# Altium PCB ePBR24_ACU_Power_rev0.PcbDoc (part 1 of 4)
Units mil, origin at the board's own origin, x right, y up, seen from the top; angles counter-clockwise.
Board outline 8165 x 3858 mil, 2 copper layers (Top Layer, Bottom Layer); 138 components, 121 nets, 515 pads, 2055 vias.
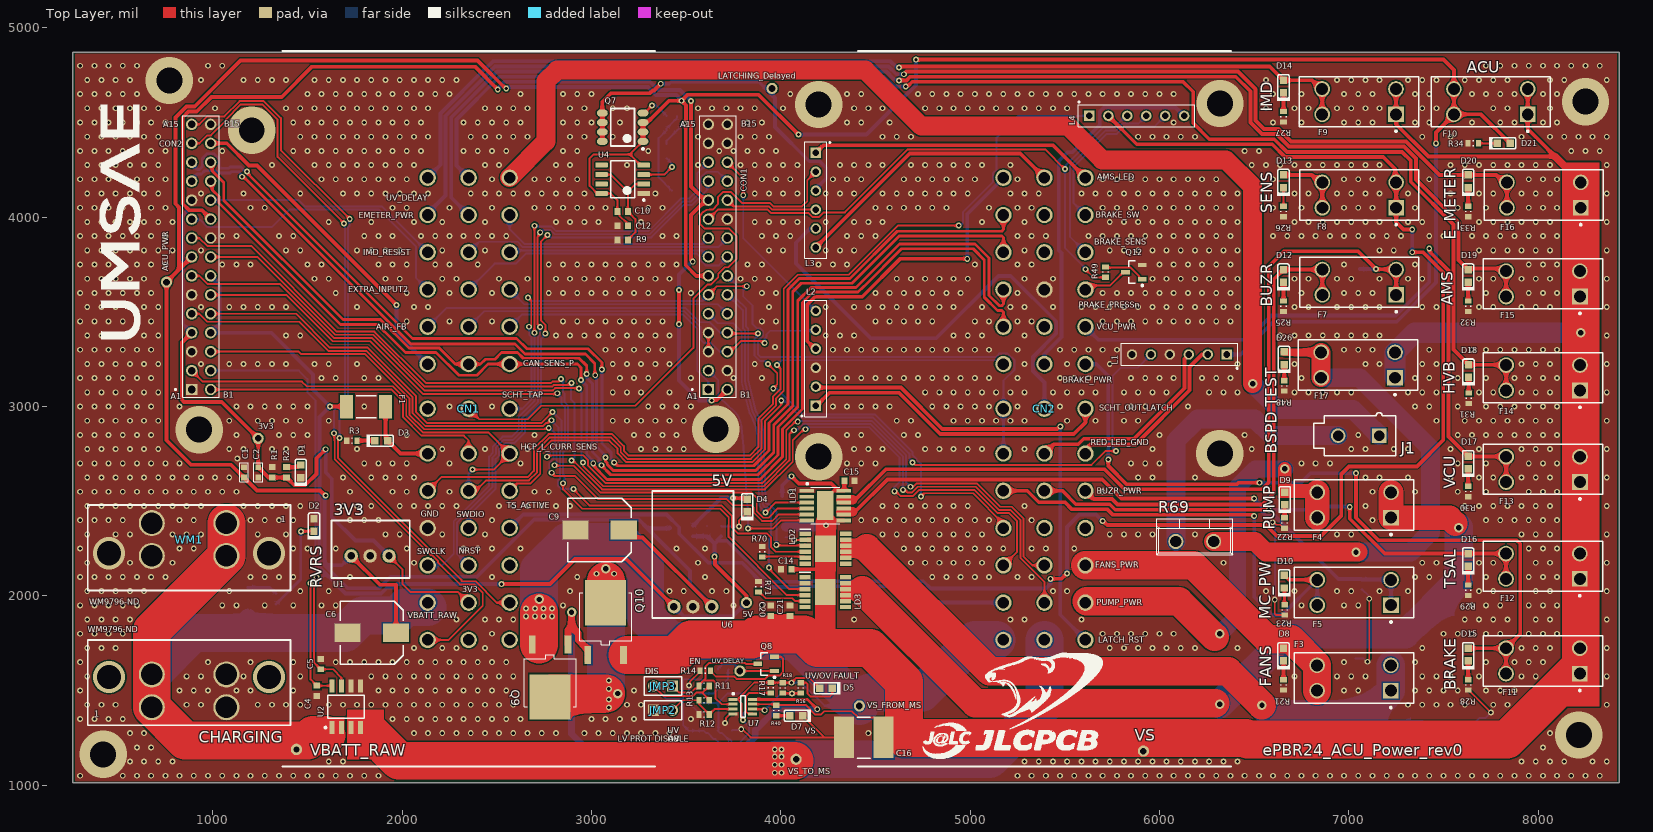
[diagram p0: Top Layer view]
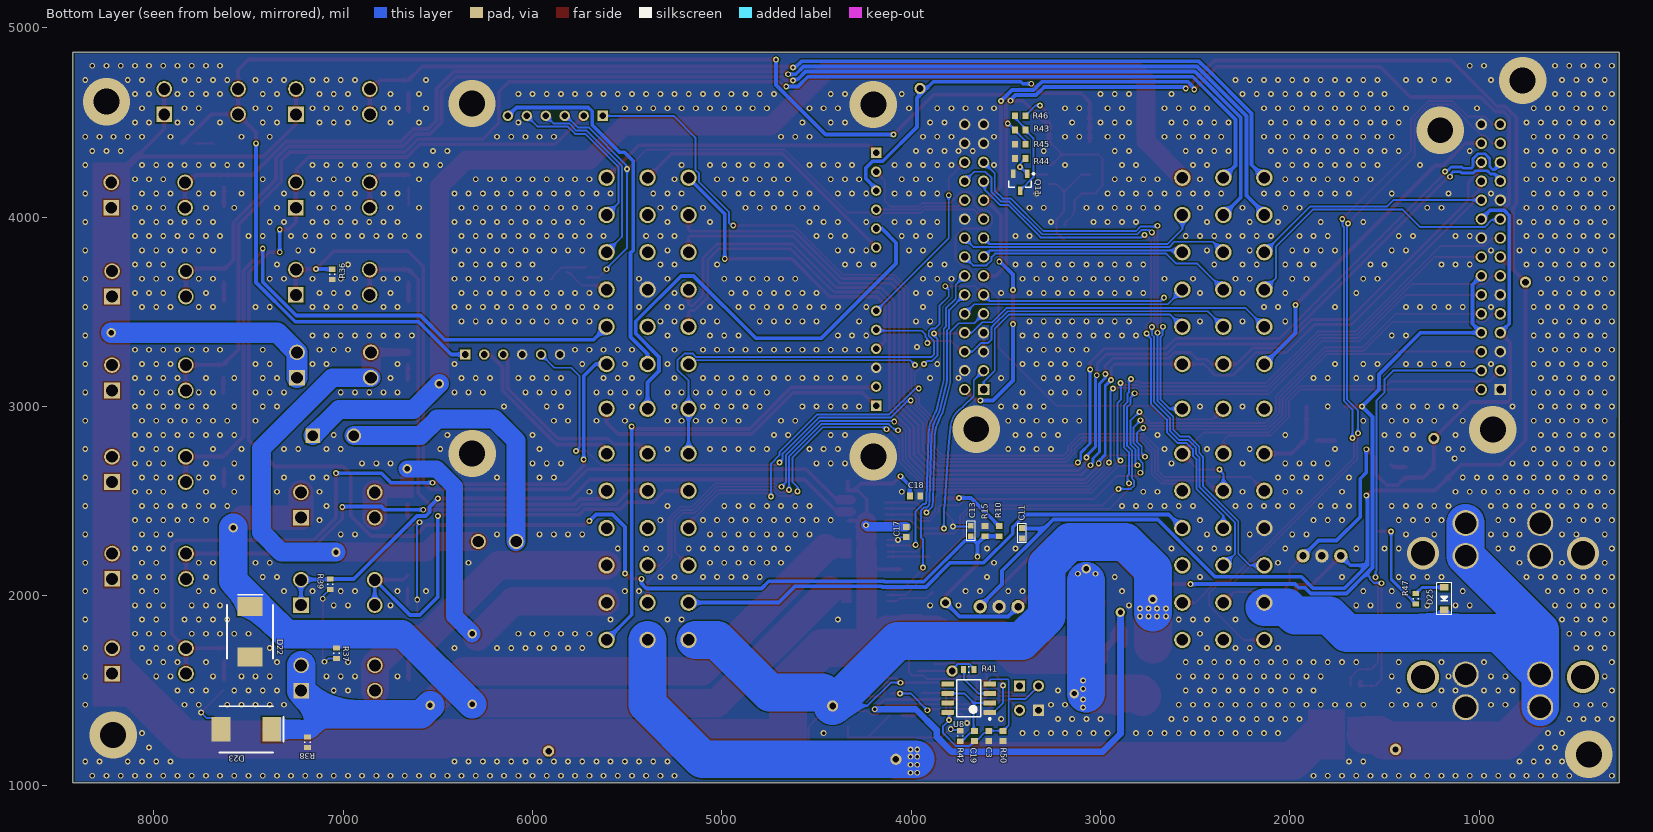
[diagram p1: Bottom Layer view, seen from below]

## Layer stack, top to bottom
Top Solder: solder mask 0.4, Solder Resist, Dk 3.5
Top Layer: signal copper 2.8
Dielectric 1: dielectric 12.6, FR-4, Dk 4.8
Bottom Layer: signal copper 2.8
Bottom Solder: solder mask 0.4, Solder Resist, Dk 3.5

## Board outline
262,1012 8427,1012 8427,4870 262,4870

## Design rules (kind name [scope] priority, off if disabled: settings)
Clearance "Stitching GND" [IsStitchingVia and InNet('GND') vs (IsVia and (Not IsStitchingVia)) Or IsPad] p1: gap=5 ignorepadtopadclearanceinfootprint=FALSE
Clearance [All] p2: gap=7 ignorepadtopadclearanceinfootprint=FALSE except(0: Arc-Hole Track-Hole SMDPad-Hole THPad-Hole Via-Hole Fill-Hole Poly-Hole Region-Hole Text-Hole)
ComponentClearance [All] p1: gap=0 collisioncheckmode=3 verticalgap=0 showdistances=FALSE
DiffPairsRouting [All] p1: maxlimit=10 minlimit=10 mostfreqgap=10 toplayer_minwidth=15 toplayer_maxwidth=15 toplayer_prefwidth=15 bottomlayer_minwidth=15 bottomlayer_maxwidth=15 bottomlayer_prefwidth=15 maxuncoupledlength=500
HoleSize [All] p1: absolutevalues=TRUE maxlimit=200 minlimit=10 maxpercent=80.000 minpercent=20.000
HoleToHoleClearance [All] p1: gap=8 allowstackedmicrovias=TRUE
MinimumAnnularRing MinimumAnnularRing_Pad [IsPad] p1: minimumring=7
MinimumAnnularRing MinimumAnnularRing_Via [IsVia] p2: minimumring=5
MinimumSolderMaskSliver [All] p1: minsoldermaskwidth=4
PlaneClearance [All] p1: clearance=15
PlaneConnect PlaneConnect_12V [InNet('12V')] p1: planeconnectstyle=Direct reliefexpansion=20 reliefentries=4 reliefconductorwidth=20 reliefairgap=10
PlaneConnect PlaneConnect_1 [All] p2: planeconnectstyle=Relief reliefexpansion=15 reliefentries=4 reliefconductorwidth=15 reliefairgap=10
PolygonConnect [All] p1: connectstyle=Direct reliefconductorwidth=15 reliefentries=4 polygonreliefangle="90 Angle" airgapwidth=10
RoutingVias [All] p1: holewidth=17 width=31 viastyle="Through Hole" minholewidth=15 minwidth=29 maxholewidth=50 maxwidth=100
SilkToSilkClearance [All] p1: silktosilkclearance=7
SilkToSolderMaskClearance [IsPad] p1: minsilkscreentomaskgap=2 clearancetoexposedcopper=TRUE
SolderMaskExpansion [All] p1: expansion=3 istentingtop=FALSE
Width [All] p1: maxlimit=200 minlimit=7 preferedwidth=15
21 further rules are at their usual default settings.

## Classes and differential pairs
component class "1  - Connectors": CN1 CN2 CON1 CON2 L1 L2 L3 L4 Q12 R49 WM1 WM9796-ND WM?
component class Designator: ACU_PWR D3 D8 D9 D10 D12 D13 D14 D15 D16 D17 D18 D19 D20 D21 D26 F1 F3 F4 F5 F7 F8 F9 F10 F11 F12 F13 F14 F15 F16 F17 J1 R3 R21 R22 R23 R25 R26 R27 R28 R29 R30 R31 R32 R33 R34 R48 R69
differential pair CAN: +CAN_P -CAN_N
differential pair CAN_SENS: +CAN_SENS_P -CAN_SENS_N

## Components (designator, comment, footprint, x,y, rotation, side; value= is the part's Value field where it differs from the comment)
3V3 "Test Via" "Test Via"#1 1240,2832 r270 top (schematic designator 5V)
5V "Test Via" "Test Via"#1 3818.72,1964.38 r180 top (schematic designator 3V3)
ACU_PWR "Test Via" "Test Via"#1 756,3657 r270 top
C1 "Cap" 0603R-generic 1165,2680 r270 top value=10uF
C2 "Cap" 0603R-generic 1240,2625.06 r90 top value=10uF
C3 "Cap Semi" 1608[0603] 3590.87,1260 r90 bottom value=10uF
C4 "Cap Semi" 1608[0603] 1550,1498.03 r90 top value=0.1uF
C5 "Cap Semi" 1608[0603] 1570,1640 r270 top value=0.1uF
C6 "UUD1H101MNL1GS" NIC-CAPA2-8X10_V 1840,1805 r180 top
C9 "UUD1H101MNL1GS" NIC-CAPA2-8X10_V 3042.95,2348 r180 top
C10 "Cap Semi" 1608[0603] 3165,4030 r180 top value=15uF
C11 "Cap" 0603R-generic 3415,2303.08 r90 bottom value=10uF
C12 "Cap Semi" 1608[0603] 3165,3955 r0 top value=10uF
C13 "Cap" 0603R-generic 3685,2370 r270 bottom value=10uF
C14 "Cap Semi" 1608[0603] 4029,2140.11 r0 top value=10uF
C15 "Cap Semi" 1608[0603] 4363,2608 r180 top value=10uF
C16 "Cap Semi" "2J-Lead 6.1 x 5.3" 4436,1253 r180 top value=33uF
C17 "Cap Semi" 1608[0603] 4026,2337.44 r90 bottom value=10uF
C18 "Cap Semi" 1608[0603] 3980,2528 r0 bottom value=10uF
C19 "Cap Semi" 1608[0603] 3665.87,1260 r270 bottom value=10uF
C20 "Cap Semi" 1608[0603] 3947.5,1922 r270 top value=10uF
C21 "Cap Semi" 1608[0603] 4048.35,1922 r270 top value=10uF
CN1 "5-1418363-1" "LEAVYSEAL 39 PIN VER" 2351.54,2988 r90 top
CN2 "5-1418363-1" "LEAVYSEAL 39 PIN VER" 5392.52,2988 r270 top
CON1 "6-534998-3" *TE_6-146257-5 3719,3690 r90 top
CON2 "6-534998-3" *TE_6-146257-5 989.98,3690 r90 top
D1 "KP-1608MGC" KING-0603LED_GREEN_V 1465,2657.8 r90 top
D2 "RVS PLTY" TOSH-0603LED_RED_V 1535,2375 r90 top
D3 "KP-1608MGC" KING-0603LED_GREEN_V 1890,2820 r0 top
D4 "KP-1608MGC" KING-0603LED_GREEN_V 3823.65,2477 r90 top
D5 "UVOV FAULT" TOSH-0603LED_RED_V 4239,1513 r180 top
D7 "BEAR EYE" TOSH-0603LED_RED_V 4081.68,1367.44 r180 top
D8 "KP-1608MGC" KING-0603LED_GREEN_V 6655,1690 r90 top
D9 "KP-1608MGC" KING-0603LED_GREEN_V 6662,2514.5 r90 top
D10 "KP-1608MGC" KING-0603LED_GREEN_V 6659,2075 r90 top
D12 "KP-1608MGC" KING-0603LED_GREEN_V 6655,3690 r90 top
D13 "KP-1608MGC" KING-0603LED_GREEN_V 6655,4190 r90 top
D14 "KP-1608MGC" KING-0603LED_GREEN_V 6655,4690 r90 top
D15 "KP-1608MGC" KING-0603LED_GREEN_V 7630,1690 r90 top
D16 "KP-1608MGC" KING-0603LED_GREEN_V 7630,2190 r90 top
D17 "KP-1608MGC" KING-0603LED_GREEN_V 7630,2704.47 r90 top
D18 "KP-1608MGC" KING-0603LED_GREEN_V 7632,3188 r90 top
D19 "KP-1608MGC" KING-0603LED_GREEN_V 7630,3690 r90 top
D20 "KP-1608MGC" KING-0603LED_GREEN_V 7630,4190 r90 top
D21 "KP-1608MGC" KING-0603LED_GREEN_V 7818.16,4390 r0 top
D22 "S8MC-13" S8MC-13 7492,1810.86 r90 bottom
D23 "S8MC-13" S8MC-13 7511,1295 r180 bottom
D25 "" SOD-123 1185,1925 r90 bottom
D26 "KP-1608MGC" KING-0603LED_GREEN_V 6658,3254.93 r90 top
F1 "1812L050PR" LFUS-1812L050_V 1810,3000 r0 top
F3 "36-3568-ND" KSTN-3568_V 7027,1566.22 r180 top
F4 "36-3568-ND" KSTN-3568_V 7028,2480 r180 top
F5 "36-3568-ND" KSTN-3568_V 7028,2017.93 r180 top
F7 "36-3568-ND" KSTN-3568_V 7055,3656.53 r180 top
F8 "36-3568-ND" KSTN-3568_V 7055,4116.93 r180 top
F9 "36-3568-ND" KSTN-3568_V 7054.23,4610 r180 top
F10 "36-3568-ND" KSTN-3568_V 7750,4610 r180 top
F11 "36-3568-ND" KSTN-3568_V 8025,1656.54 r180 top
F12 "36-3568-ND" KSTN-3568_V 8025,2156.53 r180 top
F13 "36-3568-ND" KSTN-3568_V 8026,2668 r180 top
F14 "36-3568-ND" KSTN-3568_V 8026,3152 r180 top
F15 "36-3568-ND" KSTN-3568_V 8025.88,3647.93 r180 top
F16 "36-3568-ND" KSTN-3568_V 8030,4116.93 r180 top
F17 "36-3568-ND" KSTN-3568_V 7049,3219 r180 top
J1 "39-28-1023" MOLX-39-28-1023-2_V 7052,2846 r270 top
JMP2 "Header 2" "2Pin Jumper" 3328,1396.03 r0 top
JMP3 "Header 2" "2Pin Jumper" 3428,1524 r180 top
L1 "6 Pin Header" 5-146285-6 6155,3275 r180 top
L2 "6 Pin Header" 5-146285-6 4185,3205 r90 top
L3 "6 Pin Header" 5-146285-6 4185,4140 r270 top
L4 "6 Pin Header" 5-146285-6 5830,4535 r0 top
LATCHING_Delayed "Test Via" "Test Via"#1 3954,4680 r270 top
LD1 "LD - VND5E050JTR-E" VND5E050JTR-E 4235,2477 r0 top
LD2 "VN5E050AJTR-E" SOP80P600X162-13N 4236.23,2248.74 r0 top
LD3 "VN5E050AJTR-E" SOP80P600X162-13N 4235,2020 r0 top
Q7 "PFET - FDS6675BZ" SOIC127P600X175-8N 3165,4475 r180 top
Q8 "" SOT-23_N 3922.61,1640.72 r180 top
Q9 "MCU80N03A-TP" MCU80N_MCE 2782,1541 r180 top
Q10 "MCU80N03A-TP" MCU80N_MCE 3075,1889.88 r0 top
Q11 "" SOT-23_N 3425,4185 r270 bottom
Q12 "" SOT-23_N 5865,3710 r180 top
R1 "Res1" 1608[0603] 1315,2652.5 r270 top value=100
R2 "Res1" 1608[0603] 1390,2652.5 r90 top value=82R
R3 "560" RESC0603(1608)_L 1735,2820 r180 top
R9 "Res1" 1608[0603] 3165,3880 r0 top value=1000K
R10 "Res1" 1608[0603] 3535,2342.5 r90 bottom value=180R
R11 "21K" RESC0603(1608)_L 3595,1524.01 r180 top
R12 "1K" RESC0603(1608)_L 3595,1374.01 r0 top
R13 "32K" RESC0603(1608)_L 3595,1449.01 r0 top
R14 "1K" RESC0603(1608)_L 3601,1604.41 r180 top
R15 "Res1" 1608[0603] 3610,2342.5 r270 bottom value=100
R16 "560" RESC0603(1608)_L 4106,1514 r90 top
R17 "510K" RESC0603(1608)_L 3947,1515 r270 top
R18 "10K" RESC0603(1608)_L 4010,1514 r270 top
R21 "560" RESC0603(1608)_L 6655,1530 r270 top
R22 "560" RESC0603(1608)_L 6660,2385 r270 top
R23 "560" RESC0603(1608)_L 6661,1926 r270 top
R25 "560" RESC0603(1608)_L 6655,3530 r270 top
R26 "560" RESC0603(1608)_L 6655,4030 r270 top
R27 "560" RESC0603(1608)_L 6655,4530 r270 top
R28 "560" RESC0603(1608)_L 7630,1530 r270 top
R29 "560" RESC0603(1608)_L 7630,2030 r270 top
R30 "560" RESC0603(1608)_L 7630,2551.63 r270 top
R31 "560" RESC0603(1608)_L 7634,3044 r270 top
R32 "560" RESC0603(1608)_L 7630,3530 r270 top
R33 "560" RESC0603(1608)_L 7630,4030 r270 top
R34 "560" RESC0603(1608)_L 7657,4390 r180 top
R36 "10K" RESC0603(1608)_L 7058,3698 r270 bottom
R37 "10K" RESC0603(1608)_L 7035,1697.56 r90 bottom
R38 "10K" RESC0603(1608)_L 7188,1227 r270 bottom
R39 "10K" RESC0603(1608)_L 7068,2061 r270 bottom
R40 "560" RESC0603(1608)_L 3976.52,1395 r270 top
R41 "10K" RESC0603(1608)_L 3696,1611 r180 bottom
R42 "1000K" RESC0603(1608)_L 3740.87,1260 r270 bottom
R43 "Res1" 1608[0603] 3425,4460 r0 bottom value=10K
R44 "Res1" 1608[0603] 3425,4310 r180 bottom value=10K
R45 "Res1" 1608[0603] 3425,4385 r180 bottom value=10K
R46 "Res1" 1608[0603] 3425,4535 r180 bottom value=100
R47 "560" RESC0603(1608)_L 1335,1985 r90 bottom
R48 "560" RESC0603(1608)_L 6659,3109 r270 top
R49 "1k" RESC0603(1608)_L 5715,3710 r90 top
R50 "Res1" 1608[0603] 3515.87,1260 r90 bottom value=10K
R69 "5.6R" TO220AC 6086.2,2287 r0 top
R70 "10K" RESC0603(1608)_L 3902.42,2232.99 r270 top
R71 "10K" RESC0603(1608)_L 3882,2048.66 r270 top
U1 "Volt Reg" DCDC_VERTICAL 1831,2211 r180 top
U2 "ACS723LLCTR-10AB-T" ALEG-LC-8_V 1705,1415 r0 top
U4 "NE555DR" D0008A_M 3165,4200 r180 top
U6 "Volt Reg" DCDC_HORIZONTAL 3536,1943 r0 top
U7 "LTC4365ITS8#TRMPBF" LT-TS8-8-TSOT-23_V 3800,1415 r0 top
U8 "NE555DR" D0008A_M 3696.43,1459.65 r0 bottom
UV_DELAY "Test Via" "Test Via"#2 4320,672.31 r270 top
VBATT_RAW "Test Via" "Test Via"#3 1442,1189 r270 top
VS "Test Via" "Test Via"#1 5915,1180 r270 top
VS_FROM_MS "Test Via" "Test Via"#1 4415,1419 r270 top
VS_TO_MS "Test Via" "Test Via"#1 4081,1137 r270 top
WM1 "WM9796-ND" WM9796-ND#1 875.15,2384.23 r0 top
WM9796-ND "WM9796-ND" WM9796-ND#2 199.53,1959.99 r270 top (schematic designator WM2)

## Footprints (in the part's own frame and the unit in brackets; to place one, negate y for a bottom-side part, rotate by r counter-clockwise, add the part's x,y. Pads: shape width x height; smd on the part's side, far side on the other; paste and mask are expansions set on the pad)
"2J-Lead 6.1 x 5.3" [mm]
  rect 2.7x5.6 smd: 1(-2.7,0) 2(2.6,0)
  silkscreen extent -0.9,-2.7 0.8,2.8, body extent -3.4,-2.8 3.3,2.8, height 5
"2Pin Jumper" [mm] "2 Pin quick jumper"
  rect 1.5x1.5 hole 0.9: 1(0,0)
  round 1.5 hole 0.9: 2(2.54,0)
  silkscreen extent -1.27,-1.27 3.81,1.27, body extent -1.27,-1.27 3.81,1.27, height 9.5
5-146285-6 [mm] "6-pin Header"
  rect 1.398x1.398 hole 0.89: 1(-5.08,0)
  round 1.398 hole 0.89: 2(-2.54,0) 3(0,0) 4(2.54,0) 5(5.08,0) 6(7.62,0)
  silkscreen extent -6.58,-1.47 9.05,1.97, body extent -6.37,-1.27 8.87,1.27, height 9.5
0603R-generic [mil] "RESISTOR 0603"
  rect 30x30 smd: 1(0,0) 2(55,0)
  silkscreen extent -23,-23 78,23, body extent -4,-15 59,15, height 19
1608[0603] [mm] "Chip Capacitor, Body 1.6x0.8mm, IPC High Density"
  rect 0.8x0.9 smd: 1(-0.7,0) 2(0.7,0)
  body extent -0.87,-0.48 0.87,0.48, height 1.3
*TE_6-146257-5 [mm] "HEADER VERT 30POS"
  rect 1.53x1.53 hole 1.02: A1(-15.24,2.565)
  round 1.53 hole 1.02: A2(-12.7,2.565) A3(-10.16,2.565) A4(-7.62,2.565) A5(-5.08,2.565) A6(-2.54,2.565) A7(0,2.565) A8(2.54,2.565) A9(5.08,2.565) A10(7.62,2.565) A11(10.16,2.565) A12(12.7,2.565) A13(15.24,2.565) A14(17.78,2.565) A15(20.32,2.565) B1(-15.24,0.025) B2(-12.7,0.025) B3(-10.16,0.025) B4(-7.62,0.025) B5(-5.08,0.025) B6(-2.54,0.025) B7(0,0.025) B8(2.54,0.025) B9(5.08,0.025) B10(7.62,0.025) B11(10.16,0.025) B12(12.7,0.025) B13(15.24,0.025) B14(17.78,0.025) B15(20.32,0.025)
  silkscreen extent -16.31,-1.14 21.47,4.83, body extent -16.48,-1.29 21.62,3.79, height 8.67
ALEG-LC-8_V [mm] "SOIC, 8-Leads, Body 4.9x3.9mm, Pitch 1.27mm"
  rect 0.65x1.75 smd: 1(-1.905,-2.8) 2(-0.635,-2.8) 3(0.635,-2.8) 4(1.905,-2.8) 5(1.905,2.8) 6(0.635,2.8) 7(-0.635,2.8) 8(-1.905,2.8)
  silkscreen extent -2.9,-2.92 2.45,1.53, body extent -2.45,-1.95 2.45,1.95, height 1.75
D0008A_M [mm] "SOIC, 8-Leads, Body 5x4mm, Pitch 1.27mm, IPC Low Density"
  rrect15% 1.65x0.65 smd: 1(-2.825,1.905) 2(-2.825,0.635) 3(-2.825,-0.635) 4(-2.825,-1.905) 5(2.825,-1.905) 6(2.825,-0.635) 7(2.825,0.635) 8(2.825,1.905)
  silkscreen extent -2.95,-2.5 1.6,2.9, body extent -3,-2.45 3,2.45, height 1.63
DCDC_HORIZONTAL [mm]
  round 1.8 hole 1: 1(2.54,0) 2(0,0) 3(-2.54,0)
  silkscreen extent -5.45,-1.5 5.45,15.5, body extent -5.23,-1.29 5.18,15.22, height 7.75
DCDC_VERTICAL [mm]
  round 1.8 hole 1: 1(2.54,0) 2(0,0) 3(-2.54,0)
  silkscreen extent -5.33,-4.75 5.2,2.98, body extent -5.28,-4.87 5.14,2.87, height 17.18
KING-0603LED_GREEN_V [mm] "SMT LED, 2-Leads, Body 1.6x0.8mm (0603-Size)"
  rect 1x1 smd paste+0 mask+0: 1(0.85,0) 2(-0.85,0)
  silkscreen extent -1.97,-0.85 1.6,0.85, body extent -0.92,-0.53 1.09,0.53, height 1.1
KSTN-3568_V [mm] "THD, 4-Leads, Body 16x6.73mm, Pitch 9.9mm"
  rect 2.1x2.1 hole 1.6: 1(-4.95,1.7)
  round 2.1 hole 1.6: 2(-4.95,-1.7) 3(4.95,1.7) 4(4.95,-1.7)
  silkscreen extent -8,-3.36 8,4.09, body extent -8,-3.37 8,3.37, height 7.44
"LEAVYSEAL 39 PIN VER" [mm] "Levyseal 90 degree 39 pin header 5-1418363-3"
  round 2.2 hole 1.55: 1(31,5.5) 2(31,0) 3(31,-5.5) 4(26,5.5) 5(26,0) 6(26,-5.5) 7(21,5.5) 8(21,0) 9(21,-5.5) 10(16,5.5) 11(16,0) 12(16,-5.5) 13(11,5.5) 14(11,0) 15(11,-5.5) 16(6,5.5) 17(6,0) 18(6,-5.5) 19(0,5.5) 20(0,0) 21(0,-5.5) 22(-6,5.5) 23(-6,0) 24(-6,-5.5) 25(-11,5.5) 26(-11,0) 27(-11,-5.5) 28(-16,5.5) 29(-16,0) 30(-16,-5.5) 31(-21,5.5) 32(-21,0) 33(-21,-5.5) 34(-26,5.5) 35(-26,0) 36(-26,-5.5) 37(-31,5.5) 38(-31,0) 39(-31,-5.5)
  silkscreen extent -48,-25 48,25, body extent -66,-24 66,24, height 9.5
LFUS-1812L050_V [mm] "Chip Fuse, 2-Leads, Body 4.73x3.41mm"
  rect 1.78x3.15 smd: 1(-2.615,0) 2(2.615,0)
  silkscreen extent -1.35,-1.47 1.35,1.47, body extent -2.36,-1.7 2.36,1.7, height 0.75
LT-TS8-8-TSOT-23_V [mm] "SOT23, 8-Leads, Body 2.9x1.75mm, Pitch 0.65mm"
  rect 1.22x0.4 smd: 1(-1.31,0.975) 2(-1.31,0.325) 3(-1.31,-0.325) 4(-1.31,-0.975) 5(1.31,-0.975) 6(1.31,-0.325) 7(1.31,0.325) 8(1.31,0.975)
  silkscreen extent -1.43,-1.45 0.3,1.85, body extent -0.87,-1.45 0.88,1.45, height 1
MCU80N_MCE [mil]
  rect 36x95 smd: 1(-94,-202.5) 2(94,-202.5)
  rect 217x239 smd: 3(0,74.5)
  silkscreen extent -137,-147 137,127
MOLX-39-28-1023-2_V [mm] "THD, 2-Leads, Body 11x5.8mm"
  rect 1.95x1.95 hole 1.45: 1(0,2.75)
  round 1.95 hole 1.45: 2(0,-2.75)
  silkscreen extent -3.1,-6 2.7,5, body extent -3.1,-6 2.7,5, height 13.6
NIC-CAPA2-8X10_V [mm] "Aluminum Electrolytic Capacitor, Diameter 8mm, Height 10.8mm, Pitch 6.5mm"
  rect 3.5x2.5 smd: 1(-3.25,0) 2(3.25,0)
  silkscreen extent -4.25,-4.25 4.25,4.25, body extent -3.99,-3.97 3.99,4, height 10.8
RESC0603(1608)_L [mm]
  rect 0.7x0.9 smd: 1(-0.7,0) 2(0.7,0)
  silkscreen extent -0.05,-0.35 0.05,0.35, body extent -0.85,-0.47 0.85,0.47, height 0.6
S8MC-13 [mil]
  rect 100x130 smd: 1(-133.86,0) 2(133.86,0)
  silkscreen extent -142,-122 195,122
SOD-123 [mm]
  rect 0.9x1.2 smd: A(3.048,0) K(0,0)
  silkscreen extent -0.64,-1.02 3.68,1.02, body extent -0.18,-0.87 3.3,0.87, height 0.79
SOIC127P600X175-8N [mm] "SOIC, 8-Leads, Body 4.90x3.90mm, Pitch 1.27mm, IPC Medium Density"
  oval 1.45x0.9 smd: 1(-2.725,1.905) 2(-2.725,0.635) 3(-2.725,-0.635) 4(-2.725,-1.905) 5(2.725,-1.905) 6(2.725,-0.635) 7(2.725,0.635) 8(2.725,1.905)
  silkscreen extent -2.85,-2.5 1.6,3.03, body extent -2,-2.5 2,2.5, height 1.75
SOP80P600X162-13N [mm]
  rect 1.525x0.6 smd: 1(-2.712,2) 2(-2.712,1.2) 3(-2.712,0.4) 4(-2.712,-0.4) 5(-2.712,-1.2) 6(-2.712,-2) 7(2.712,-2) 8(2.712,-1.2) 9(2.712,-0.4) 10(2.712,0.4) 11(2.712,1.2) 12(2.712,2)
  rect 2.8x3.5 smd: 13(0,0)
  silkscreen extent -3.47,2.65 -1.95,2.65, body extent -3,-2.45 3,2.45, height 1.62
SOT-23_N [mm] "SOT23, 3-Leads, Body 2.9x1.3mm, Pitch 0.95mm, Lead Span 2.5mm, IPC Medium Density"
  rect 1.15x0.6 smd: 1(-1.125,0.95) 2(-1.125,-0.95) 3(1.125,0)
  silkscreen extent -1.25,-1.5 0.7,1.92, body extent -0.7,-1.5 0.7,1.5, height 1.1
"Test Via"#1 [mm] "Test Via Hole"
  round 1.5 hole 0.9: 1(0,0)
"Test Via"#2 [mm] "Test Via Hole"
  round 1.5 hole 0.9: 1(-23.647,-13.614)
"Test Via"#3 [mm] "Test Via Hole"
  oval 1.551x1.5 hole 0.798: 1(0,0)
TO220AC [mil]
  round 80 hole 60: 1(200,0) 2(0,0)
  silkscreen extent -100,-70 300,120, body extent -100,-70 300,120, height 920
TOSH-0603LED_RED_V [mm] "SMT LED, 2-Leads, Body 1.6x0.8mm (0603-Size)"
  rect 1x1 smd paste+0 mask+0: 1(0.85,0) 2(-0.85,0)
  silkscreen extent -1.97,-0.85 1.6,0.85, body extent -0.92,-0.53 1.09,0.53, height 0.6
VND5E050JTR-E [mm]
  rect 1.97x0.5 smd: 1(-2.475,2) 2(-2.475,1.2) 3(-2.475,0.4) 4(-2.475,-0.4) 5(-2.475,-1.2) 6(-2.475,-2) 7(2.475,-2) 8(2.475,-1.2) 9(2.475,-0.4) 10(2.475,0.4) 11(2.475,1.2) 12(2.475,2)
  rect 2.2x3.9 smd: 13(0,0)
  silkscreen extent -2.54,-2.45 1.95,3.05
WM9796-ND#1 [mm]
  round 3.5 hole 2.9: 1(5,-4.4) 1(5,0) 2(-5,-4.4) 2(-5,0)
  silkscreen extent -13.59,-9.02 13.59,2.41, body extent -11.78,-9.51 12.04,4.59, height 21.3
WM9796-ND#2 [mm]
  round 3.5 hole 2.9: 1(9.519,12.161) 1(13.919,12.161) 2(9.519,22.161) 2(13.919,22.161)
  silkscreen extent 4.9,3.57 16.33,30.75, body extent 4.4,5.12 18.5,28.94, height 21.3

## Part data
3V3 5V ACU_PWR LATCHING_Delayed UV_DELAY VBATT_RAW VS VS_FROM_MS VS_TO_MS: library part "Test VIa"
C1 C2 C11 C13: "Capacitor", Capacitance=10µF, Manufacturer=Yageo, Manufacturer Part Number=CC1210ZKY5V8BB106, Operating Temperature="-30°C ~ 85°C", Package / Case="1210 (3225 Metric)", Ratings=-, Supplier Part Number 1=311-2063-1-ND, Temperature Coefficient="Y5V (F)", Tolerance="-20%, +80%", Voltage - Rated=25V, Applications="General Purpose", Category=Capacitors, ComponentLink1Description=http://www.yageo.com/documents/recent/UPY-GPHC_Y5V_6.3V-to-50V_7.pdf, ComponentLink1URL=http://www.yageo.com/documents/recent/UPY-GPHC_Y5V_6.3V-to-50V_7.pdf, Failure Rate=-, Features=-, Height - Seated (Max)=-, Lead Spacing=-, Lead Style=-, Mounting Type="Surface Mount, MLCC", Packaging="Cut Tape (CT)", Part Status=Active, Pricing 1="1=0.47, 10=0.323, 25=0.258, 50=0.2154, 100=0.1829, 250=0.14528, 500=0.12912, 1000=0.11298 (CAD)", RoHS="RoHS Compliant", Size / Dimension="0.126\" L x 0.098\" W (3.20mm x 2.50mm)", Stock 1=1156, Supplier 1=Digi-Key, Supplier 2=Digi-Key, Supplier Part Number 2=1276-1869-1-ND, Thickness (Max)="0.083\" (2.10mm)"
C3 C10 C12 C14 C15 C17 C18 C19 C20 C21: "Capacitor (Semiconductor SIM Model)", Supplier Part Number 1=490-10991-1-ND, LatestRevisionDate=29-May-2009, LatestRevisionNote="IPC-7351 Footprint Added.", PackageDescription="Chip Capacitor", PackageReference=C1206, Published=8-Jun-2000, Publisher="Altium Limited", Supplier 1=Digi-Key
C4 C5: "Capacitor (Semiconductor SIM Model)", LatestRevisionDate=29-May-2009, LatestRevisionNote="IPC-7351 Footprint Added.", PackageDescription="Chip Capacitor", PackageReference=C1206, Published=8-Jun-2000, Publisher="Altium Limited", Supplier 1=Digi-Key, Supplier 2=Digi-Key, Supplier Part Number 2=490-14359-1-ND
C6 C9: library part CMP-0687-00073-1, "Aluminum Electrolytic Capacitor, UD Series, Low Impedance, 100 uF, 50 V, + / - 20%, -55 to 105 degC, Chip Type, 8 x 10 mm D x L, Pb-Free, Reel", Capacitance=100µF, ESR (Equivalent Series Resistance)=-, Lifetime @ Temp.="5000 Hrs @ 105°C", Manufacturer=Nichicon, Operating Temperature="-55°C ~ 105°C", Package / Case="Radial, Can - SMD", Rated Capacitance="100 uF", Rated Ripple Current (at 100kHz)="300 mA", Rated Voltage="50 V", Ripple Current=300mA, Supplier Part Number 1=493-2306-1-ND, Tolerance=±20%, Tolerance Rated Capacitance="-20 to 20%", Voltage Rating=50V, Applications="General Purpose", Category=Capacitors, ComponentLink1Description="Manufacturer URL", ComponentLink1URL=http://www.nichicon.co.jp/, ComponentLink2Description=Datasheet, ComponentLink2URL=http://products.nichicon.co.jp/en/pdf/XJA043/e-ud.pdf, ComponentLink3Description="Package Specification", ComponentLink3URL=http://products.nichicon.co.jp/en/pdf/XJA043/e-ud.pdf, ComponentLink4Description=http://nichicon-us.com/english/products/pdfs/e-uud.pdf, ComponentLink4URL=http://nichicon-us.com/english/products/pdfs/e-uud.pdf, DatasheetVersion=08/2012, Diameter="8 mm", Endurance Time="5000 h", Height - Seated (Max)="0.394\" (10.00mm)", Impedance="0.34 Ohm", Lead Spacing=-, Length="10 mm", Manufacturer Part Number=UUD1H101MNL1GS, Mounting Technology="Surface Mount", Mounting Type="Surface Mount", PackageDescription="2-Pin Surface Mount Device, Diameter 8 mm, Height 10 mm, Pitch 6.5 mm", PackageReference=CAPAE-D8H10, Packaging="Cut Tape (CT)", Packing="Dia382mm Reel", PartNumber=UUD1H101MNL1GS, Part Status=Active, Polarization=Polar, Pricing 1="1=0.92, 10=0.685, 25=0.5868, 50=0.5478, 100=0.4696, 250=0.43044 (CAD)", RoHS=TRUE, Size / Dimension="0.315\" Dia (8.00mm)", Stock 1=65948, Supplier 1=Digi-Key, Surface Mount Land Size="0.327\" L x 0.327\" W (8.30mm x 8.30mm)"
C16: "Capacitor (Semiconductor SIM Model)", Supplier Part Number 1=490-5834-1-ND, LatestRevisionDate=29-May-2009, LatestRevisionNote="IPC-7351 Footprint Added.", PackageDescription="Chip Capacitor", PackageReference=C1206, Published=8-Jun-2000, Publisher="Altium Limited", Supplier 1=Digi-Key
CN1 CN2: library part 5-1418363-3, "Levyseal Vertical 39 pin header"
CON1 CON2: Supplier Part Number 1=S7118-ND, Built_By=EMA_UL_Team, C="Copyright (C) 2015 Accelerated Designs. All rights reserved", Manufacturer_Part_Number=6-534998-3, Supplier 1=Digi-Key, Vendor="TE Connectivity"
D1 D4: library part CMP-0404-00001-1, "LED, SMT, 0603(1608), 1.1mm thickness, Green", Forward Current="30 mA", Manufacturer=Kingbright, Power Dissipation="75 mW", Reverse Voltage="5 V", Storage Temperature="-40 to +85 degC", Supplier Part Number 1=475-2815-1-ND, ComponentLink1Description="Manufacturer URL", ComponentLink1URL=http://www.kingbright.com/, Mounting Technology="Surface Mount", PackageDescription="2-Pin SMT LED, 1.6 x 0.8 mm Pitch", PackageReference=0603LED_GREEN, Packing Type="2000 pcs / reel", PartNumber=KP-1608MGC, Supplier 1=Digi-Key
D2 D5 D7: library part CMP-0444-00001-1, "LED, Red 0603 (1608) 63mCd", Forward Current="25 mA", Manufacturer=Toshiba, PartNumber=TLSU1008A(T04), Power Dissipation="60 mW", Reverse Voltage="4 V", Storage Temperature="-40 to 100 degC", Supplier Part Number 1=475-2512-1-ND, ComponentLink1Description="Manufacturer URL", ComponentLink1URL=http://www.toshiba-components.com/, ComponentLink2Description=Datasheet, ComponentLink2URL=http://www.semicon.toshiba.co.jp/info/docget.jsp?type=datasheet&lang=en&pid=TLSU1008A(T04), DatasheetVersion=Aug-08, Mounting Technology="Surface Mount", PackageDescription="2-Pin SMT LED, 1.6 x 0.8 mm Pitch", PackageReference=0603LED_RED, Packing Type=Reel, Supplier 1=Digi-Key
D3 D8 D9 D12 D13 D15 D16 D17 D26: library part CMP-0404-00001-1, "LED, SMT, 0603(1608), 1.1mm thickness, Green", Forward Current="30 mA", Manufacturer=Kingbright, Power Dissipation="75 mW", Reverse Voltage="5 V", Storage Temperature="-40 to +85 degC", Supplier Part Number 1=732-4980-1-ND, ComponentLink1Description="Manufacturer URL", ComponentLink1URL=http://www.kingbright.com/, Mounting Technology="Surface Mount", PackageDescription="2-Pin SMT LED, 1.6 x 0.8 mm Pitch", PackageReference=0603LED_GREEN, Packing Type="2000 pcs / reel", PartNumber=KP-1608MGC, Supplier 1=Digi-Key
D10 D14 D18 D19 D20 D21: library part CMP-0404-00001-1, "LED, SMT, 0603(1608), 1.1mm thickness, Green", Forward Current="30 mA", Manufacturer=Kingbright, Power Dissipation="75 mW", Reverse Voltage="5 V", Storage Temperature="-40 to +85 degC", Supplier Part Number 1=160-1437-1-ND, ComponentLink1Description="Manufacturer URL", ComponentLink1URL=http://www.kingbright.com/, Mounting Technology="Surface Mount", PackageDescription="2-Pin SMT LED, 1.6 x 0.8 mm Pitch", PackageReference=0603LED_GREEN, Packing Type="2000 pcs / reel", PartNumber=KP-1608MGC, Supplier 1=Digi-Key
D22 D23: library part Diode, "Default Diode", Supplier Part Number 1=S8MCDICT-ND, Supplier 1=Digi-Key
D25: library part "Diode 1N4003", "1 Amp General Purpose Rectifier", Supplier Part Number 1=641-1624-1-ND, Code_JEDEC=DO-204-AL, ComponentLink1Description="Manufacturer Link", ComponentLink1URL=http://www.fairchildsemi.com/, ComponentLink2Description=Datasheet, ComponentLink2URL=http://www.fairchildsemi.com/ds/1N%2F1N4001.pdf, DatasheetVersion=1998, LatestRevisionDate=17-Jul-2002, LatestRevisionNote="Re-released for DXP Platform.", PackageDescription="Diode, Axial; Body 5.2 x 2.7 mm (LxDia. max), Lead Dia. 0.86 mm (max)", PackageReference=DO-41, PackageVersion=Aug-1999, Published=8-Jun-2000, Publisher="Altium Limited", Supplier 1=Digi-Key
F1: library part CMP-1700-00002-1, "POLY-FUSE(R) Resettable PTC, 0.5 A, 0.15 to 1 Ohm Resistance, -40 to 85 degC, 1812 (4532 Metric), RoHS, Tape and Reel", Case\Package=0603, Case Code (Metric)=1608, Max Operating Temperature="155 degC", Min Operating Temperature="-55 degC", Package Quantity=1, Power Rating="100 mW", Resistance="150 kohm", Supplier Part Number 1=F2150CT-ND, Tolerance=1%, Voltage Rating="50 V", Case Code (Imperial)=0603, ComponentLink1Description="Manufacturer URL", ComponentLink1URL=http://www.littelfuse.com/, ComponentLink2Description=Datasheet, ComponentLink2URL=http://www.littelfuse.com/~/media/electronics/datasheets/resettable_ptcs/littelfuse_ptc_1812l_datasheet.pdf.pdf, DatasheetVersion=Feb-16, Height="0.45 mm", Length="1.6 mm", Mount="Surface Mount", PackageDescription="2-Pin Surface Mount Device, Body 4.55 x 3.24 mm", PackageReference=1812, Packaging="Tape and Reel", Pins=2, REACH SVHC="No SVHC", RoHSCompliant=true, Supplier 1=Digi-Key, Voltage Rating (DC)="50 V", Width="0.8 mm"
F3: library part CMP-2000-05464-1, Manufacturer=Keystone, Package Description="4-Pin Through Hole Device, Body 16 x 6.73 mm, Pitch 9.9 mm", Package Reference=3568, Datasheet URL=https://datasheet.ciiva.com/16294/m60-2p40-16294706.pdf, Datasheet Version=04/2013, Manufacturer URL=http://www.keyelco.com/, Mounting Technology=ThroughHole
F4 F5 F7 F8 F9 F10 F11 F12 F13 F14 F15 F16 F17: library part CMP-2000-05464-1, "Fuse Holder, 20 A, 500 V, -50 to 145 degC, 4-Pin THD, RoHS", Manufacturer=Keystone, Package Description="4-Pin Through Hole Device, Body 16 x 6.73 mm, Pitch 9.9 mm", Package Reference=3568, Datasheet URL=https://datasheet.ciiva.com/16294/m60-2p40-16294706.pdf, Datasheet Version=04/2013, Manufacturer URL=http://www.keyelco.com/, Mounting Technology=ThroughHole
J1: library part CMP-2000-05244-1, "Female Header, Pitch 4.2 mm, 1 x 2 Position, Height 12.8 mm, Tail Length 3.5 mm, -40 to 105 degC, RoHS", Colour=Clear, Current Rating=13A, Flammability Rating=UL94V-2, Manufacturer=Molex, Voltage Rating V AC=600V, Working Voltage=250V, Connector Body Material=–, Connector Insert Type=Header, Connector Mounting=PCB, Connector Mounting Orientation=PCB, Connector Type=RectangularPower, Contact Gender=–, Contact Material=Brass, Contact Plating=Tin, Contact Termination=Solder, Datasheet URL=https://datasheet.ciiva.com/11746/0900766b80460d9e-11746456.pdf, Datasheet Version="Rev. F, 05/2004", Gender=Header, Lead Spacing=4.2mm, Manufacturer URL=http://www.molex.com/, Mounting Orientation=Straight, Mounting Type=PCBoard, MSL=–, No. of Contacts=4, No. of Poles=2, No. of Rows=1, No. of Ways=2, Pitch Spacing=4.2mm, Series=Mini-FitJr, SVHC=–, Termination Method=Solder
JMP2 JMP3: "Header, 2-Pin", Current Rating="3A per Contact", Insulation Color=Black, Manufacturer="Harwin Inc.", Manufacturer Part Number=M20-9990246, Material Flammability Rating="UL94 V-0", Operating Temperature="-40°C ~ 105°C", Supplier Part Number 1=S1012E-02-ND, Voltage Rating=-, Applications=-, Category="Connectors, Interconnects", ComponentLink1Description=https://cdn.harwin.com/pdfs/M20-999.pdf, ComponentLink1URL=https://cdn.harwin.com/pdfs/M20-999.pdf, Connector Type="Header, Cuttable", Contact Finish - Mating=Tin, Contact Finish - Post=Tin, Contact Finish Thickness - Mating=-, Contact Finish Thickness - Post=-, Contact Length - Mating="0.240\" (6.10mm)", Contact Length - Post="0.118\" (3.00mm)", Contact Material=Brass, Contact Shape=Square, Contact Type="Male Pin", Fastening Type=Push-Pull, Features=-, Ingress Protection=-, Insulation Height="0.100\" (2.54mm)", Insulation Material="Polyamide (PA6T), Nylon 6T", LatestRevisionDate=17-Jul-2002, LatestRevisionNote="Re-released for DXP Platform.", Mated Stacking Heights="10.04mm, 10.64mm, 11.04mm, 16.54mm", Mounting Type="Through Hole", Number of Positions=2, Number of Positions Loaded=All, Number of Rows=1, Overall Contact Length="0.460\" (11.68mm)", Packaging=Bulk, Part Status=Active, Pitch - Mating="0.100\" (2.54mm)", Publisher="Altium Limited", RoHS="RoHS Compliant", Row Spacing - Mating=-, Shrouding=Unshrouded, Style="Board to Board or Cable", Supplier 1=Digi-Key, Termination=Solder
L1 L2 L3 L4: Supplier Part Number 1=A32700-40-ND, Supplier 1=Digi-Key, Supplier 2=Digi-Key, Supplier Part Number 2=A32700-06-ND
LD1: library part "LOAD DRIVER - VND5E050JTR-E", Supplier Part Number 1=497-11700-1-ND, Supplier 1=Digi-Key
LD2 LD3: "Integrated Circuit", Manufacturer_Name=STMicroelectronics, Mouser Part Number=511-VN5E050AJTR-E, Arrow Part Number=VN5E050AJTR-E, Arrow Price/Stock=https://www.arrow.com/en/products/vn5e050ajtr-e/stmicroelectronics, Datasheet Link=https://www.st.com/resource/en/datasheet/vn5e050aj-e.pdf, Height=1.62mm, Manufacturer_Part_Number=VN5E050AJTR-E, Mouser Price/Stock=https://www.mouser.co.uk/ProductDetail/STMicroelectronics/VN5E050AJTR-E?qs=%252BB84zevwoRDZrW3RKCiWfw%3D%3D
Q7: library part MOSFET, "MOSFET P-CH 8-SOIC", Current - Continuous Drain (Id) @ 25°C="11A (Ta)", Drain to Source Voltage (Vdss)=30V, Drive Voltage (Max Rds On,  Min Rds On)="4.5V, 10V", Input Capacitance (Ciss) (Max) @ Vds="2470pF @ 15V", Manufacturer="Fairchild/ON Semiconductor", Manufacturer Part Number=FDS6675BZ, Operating Temperature="-55°C ~ 150°C (TJ)", Package / Case="8-SOIC (0.154\", 3.90mm Width)", Power Dissipation (Max)="2.5W (Ta)", Supplier Device Package=8-SO, Supplier Part Number 1=FDS6675BZCT-ND, Category="Discrete Semiconductor Products", ComponentLink1Description=https://www.fairchildsemi.com/datasheets/FD/FDS6675BZ.pdf, ComponentLink1URL=https://www.fairchildsemi.com/datasheets/FD/FDS6675BZ.pdf, FET Feature=-, FET Type=P-Channel, Gate Charge (Qg) (Max) @ Vgs="62nC @ 10V", Mounting Type="Surface Mount", Packaging="Cut Tape (CT)", Part Status=Active, Pricing 1="1=1.29, 10=1.156, 100=0.9013, 500=0.74452, 1000=0.58778 (CAD)", Rds On (Max) @ Id, Vgs="13 mOhm @ 11A, 10V", RoHS="RoHS Compliant", Stock 1=7940, Supplier 1=Digi-Key, Technology="MOSFET (Metal Oxide)", Vgs (Max)=±25V, Vgs(th) (Max) @ Id="3V @ 250µA"
Q8: library part MOSFET-N, "N-Channel MOSFET", Current - Continuous Drain (Id) @ 25°C="50A (Tc)", Drain to Source Voltage (Vdss)=30V, Input Capacitance (Ciss) @ Vds="1900pF @ 15V", Manufacturer="Infineon Technologies", Manufacturer Part Number="IPD075N03L G", Package / Case="TO-252-3, DPak (2 Leads + Tab), SC-63", Power - Max=47W, Supplier Device Package=PG-TO252-3, Supplier Part Number 1=DMG3406L-13DICT-ND, Category="Discrete Semiconductor Products", ComponentLink1Description=http://www.infineon.com/dgdl/Infineon-IPD075N03LG-DS-v02_01-en.pdf?folderId=5546d4694909da4801490a07012f053b&fileId=db3a30431936bc4b011951d824f83aeb, ComponentLink1URL=http://www.infineon.com/dgdl/Infineon-IPD075N03LG-DS-v02_01-en.pdf?folderId=5546d4694909da4801490a07012f053b&fileId=db3a30431936bc4b011951d824f83aeb, ComponentLink2Description=http://www.semicon.toshiba.co.jp/info/docget.jsp?type=datasheet&lang=en&pid=SSM3K329R, ComponentLink2URL=http://www.semicon.toshiba.co.jp/info/docget.jsp?type=datasheet&lang=en&pid=SSM3K329R, FET Feature="Logic Level Gate", FET Type="MOSFET N-Channel, Metal Oxide", Gate Charge (Qg) @ Vgs="18nC @ 10V", LatestRevisionDate=17-Jul-2002, LatestRevisionNote="Re-released for DXP Platform.", Mounting Type="Surface Mount", PackageDescription="TO, Flat Index; 3 In-Line, Axial Leads; Body Dia. 4.6mm; Lead Dia. 0.5 mm (max)", PackageReference=E3, PackageVersion=1995/1996, Packaging="Cut Tape (CT)", Published=8-Jun-2000, Publisher="Altium Limited", Rds On (Max) @ Id, Vgs="7.5 mOhm @ 30A, 10V", RoHS="RoHS Compliant", Supplier 1=Digi-Key, Vgs(th) (Max) @ Id="2.2V @ 250µA"
Q9 Q10: Mfr_Name=MCC, C="Copyright (C) 2018 Accelerated Designs. All rights reserved", Copyright="Copyright (C) 2022 Ultra Librarian. All rights reserved.", Manufacturer_Part_Number=MCU80N03A-TP
Q11: library part MOSFET-N, "N-Channel MOSFET", Current - Continuous Drain (Id) @ 25°C="50A (Tc)", Drain to Source Voltage (Vdss)=30V, Input Capacitance (Ciss) @ Vds="1900pF @ 15V", Manufacturer="Infineon Technologies", Manufacturer Part Number="IPD075N03L G", Package / Case="TO-252-3, DPak (2 Leads + Tab), SC-63", Power - Max=47W, Supplier Device Package=PG-TO252-3, Supplier Part Number 1=DMG3406L-13DI-ND, Category="Discrete Semiconductor Products", ComponentLink1Description=http://www.infineon.com/dgdl/Infineon-IPD075N03LG-DS-v02_01-en.pdf?folderId=5546d4694909da4801490a07012f053b&fileId=db3a30431936bc4b011951d824f83aeb, ComponentLink1URL=http://www.infineon.com/dgdl/Infineon-IPD075N03LG-DS-v02_01-en.pdf?folderId=5546d4694909da4801490a07012f053b&fileId=db3a30431936bc4b011951d824f83aeb, ComponentLink2Description=http://www.semicon.toshiba.co.jp/info/docget.jsp?type=datasheet&lang=en&pid=SSM3K329R, ComponentLink2URL=http://www.semicon.toshiba.co.jp/info/docget.jsp?type=datasheet&lang=en&pid=SSM3K329R, FET Feature="Logic Level Gate", FET Type="MOSFET N-Channel, Metal Oxide", Gate Charge (Qg) @ Vgs="18nC @ 10V", LatestRevisionDate=17-Jul-2002, LatestRevisionNote="Re-released for DXP Platform.", Mounting Type="Surface Mount", PackageDescription="TO, Flat Index; 3 In-Line, Axial Leads; Body Dia. 4.6mm; Lead Dia. 0.5 mm (max)", PackageReference=E3, PackageVersion=1995/1996, Packaging="Cut Tape (CT)", Published=8-Jun-2000, Publisher="Altium Limited", Rds On (Max) @ Id, Vgs="7.5 mOhm @ 30A, 10V", RoHS="RoHS Compliant", Supplier 1=Digi-Key, Vgs(th) (Max) @ Id="2.2V @ 250µA"
Q12: library part MOSFET-N, "N-Channel MOSFET", Current - Continuous Drain (Id) @ 25°C="50A (Tc)", Drain to Source Voltage (Vdss)=30V, Input Capacitance (Ciss) @ Vds="1900pF @ 15V", Manufacturer="Infineon Technologies", Package / Case="TO-252-3, DPak (2 Leads + Tab), SC-63", Power - Max=47W, Supplier Device Package=PG-TO252-3, Supplier Part Number 1=DMG3406L-13DICT-ND, Category="Discrete Semiconductor Products", ComponentLink1Description=http://www.infineon.com/dgdl/Infineon-IPD075N03LG-DS-v02_01-en.pdf?folderId=5546d4694909da4801490a07012f053b&fileId=db3a30431936bc4b011951d824f83aeb, ComponentLink1URL=http://www.infineon.com/dgdl/Infineon-IPD075N03LG-DS-v02_01-en.pdf?folderId=5546d4694909da4801490a07012f053b&fileId=db3a30431936bc4b011951d824f83aeb, ComponentLink2Description=http://www.semicon.toshiba.co.jp/info/docget.jsp?type=datasheet&lang=en&pid=SSM3K329R, ComponentLink2URL=http://www.semicon.toshiba.co.jp/info/docget.jsp?type=datasheet&lang=en&pid=SSM3K329R, FET Feature="Logic Level Gate", FET Type="MOSFET N-Channel, Metal Oxide", Gate Charge (Qg) @ Vgs="18nC @ 10V", LatestRevisionDate=17-Jul-2002, LatestRevisionNote="Re-released for DXP Platform.", Mounting Type="Surface Mount", PackageDescription="TO, Flat Index; 3 In-Line, Axial Leads; Body Dia. 4.6mm; Lead Dia. 0.5 mm (max)", PackageReference=E3, PackageVersion=1995/1996, Packaging="Cut Tape (CT)", Published=8-Jun-2000, Publisher="Altium Limited", Rds On (Max) @ Id, Vgs="7.5 mOhm @ 30A, 10V", RoHS="RoHS Compliant", Supplier 1=Digi-Key, Vgs(th) (Max) @ Id="2.2V @ 250µA"
R1 R2 R15: "Resistor", Manufacturer=Yageo, Manufacturer Part Number=RC0603JR-0782RL, Operating Temperature="-55°C ~ 155°C", Package / Case="0603 (1608 Metric)", Power (Watts)="0.1W, 1/10W", Resistance (Ohms)=82, Supplier Device Package=0603, Supplier Part Number 1=311-82GRCT-ND, Temperature Coefficient=±100ppm/°C, Tolerance=±5%, Category=Resistors, ComponentLink1Description=http://www.yageo.com/NewPortal/yageodocoutput?fileName=/pdf/R-Chip/PYu-RC_Group_51_RoHS_L_4.pdf, ComponentLink1URL=http://www.yageo.com/NewPortal/yageodocoutput?fileName=/pdf/R-Chip/PYu-RC_Group_51_RoHS_L_4.pdf, Composition="Thick Film", Failure Rate=-, Features="Moisture Resistant", Height - Seated (Max)="0.022\" (0.55mm)", Number of Terminations=2, Packaging="Cut Tape (CT)", Part Status=Active, Pricing 1="1=0.16, 10=0.016, 25=0.0112, 50=0.0084, 100=0.0062, 250=0.0048, 500=0.00382, 1000=0.00281 (CAD)", RoHS="RoHS Compliant", Size / Dimension="0.063\" L x 0.031\" W (1.60mm x 0.80mm)", Stock 1=72049, Supplier 1=Digi-Key
R3 R21 R22 R23 R25 R26 R27 R28 R29 R30 R31 R32 R33 R34 R40 R48: library part CMP-1591-00001-1, "0603 (1608 Metric) Chip Resistor", Case-EIA=0603, Case-Metric=1608, Supplier Part Number 1=P560BZCT-ND, PackageReference=RESC0603(1608), Supplier 1=Digi-Key
R9: "RES SMD 33K OHM 5% 1/4W 0603", Manufacturer="Rohm Semiconductor", Manufacturer Part Number=ESR03EZPJ333, Operating Temperature="-55°C ~ 155°C", Package / Case="0603 (1608 Metric)", Power (Watts)="0.25W, 1/4W", Resistance (Ohms)=33k, Supplier Device Package=0603, Supplier Part Number 1=RHM33KDCT-ND, Temperature Coefficient=±200ppm/°C, Tolerance=±5%, Category=Resistors, ComponentLink1Description=http://rohmfs.rohm.com/en/products/databook/datasheet/passive/resistor/chip_resistor/esr.pdf, ComponentLink1URL=http://rohmfs.rohm.com/en/products/databook/datasheet/passive/resistor/chip_resistor/esr.pdf, Composition="Thick Film", Failure Rate=-, Features="Automotive AEC-Q200, Pulse Withstanding", Height - Seated (Max)="0.022\" (0.55mm)", LatestRevisionDate=17-Jul-2002, LatestRevisionNote="Re-released for DXP Platform.", PackageDescription="Axial Device, Thru-Hole; 2 Leads; 0.3 in Pin Spacing", PackageReference=AXIAL-0.3, Packaging="Cut Tape (CT)", Part Status=Active, Pricing 1="1=0.15, 10=0.119, 25=0.0824, 50=0.0642, 100=0.0458, 250=0.03568, 500=0.02836, 1000=0.02012 (CAD)", Published=8-Jun-2000, Publisher="Altium Limited", RoHS="RoHS Compliant", Size / Dimension="0.063\" L x 0.031\" W (1.60mm x 0.80mm)", Stock 1=5269, Supplier 1=Digi-Key
R10: "Resistor", Manufacturer=Yageo, Manufacturer Part Number=RC0603JR-07180RL, Operating Temperature="-55°C ~ 155°C", Package / Case="0603 (1608 Metric)", Power (Watts)="0.1W, 1/10W", Resistance (Ohms)=180, Supplier Device Package=0603, Supplier Part Number 1=311-180GRCT-ND, Temperature Coefficient=±100ppm/°C, Tolerance=±5%, Category=Resistors, ComponentLink1Description=http://www.yageo.com/NewPortal/yageodocoutput?fileName=/pdf/R-Chip/PYu-RC_Group_51_RoHS_L_4.pdf, ComponentLink1URL=http://www.yageo.com/NewPortal/yageodocoutput?fileName=/pdf/R-Chip/PYu-RC_Group_51_RoHS_L_4.pdf, Composition="Thick Film", Failure Rate=-, Features="Moisture Resistant", Height - Seated (Max)="0.022\" (0.55mm)", Number of Terminations=2, Packaging="Cut Tape (CT)", Part Status=Active, Pricing 1="1=0.16, 10=0.016, 25=0.0112, 50=0.0084, 100=0.0062, 250=0.0048, 500=0.00382, 1000=0.00281 (CAD)", RoHS="RoHS Compliant", Size / Dimension="0.063\" L x 0.031\" W (1.60mm x 0.80mm)", Stock 1=201936, Supplier 1=Digi-Key
R11 R12 R13 R14 R17 R42: library part CMP-1591-00001-1, "0603 (1608 Metric) Chip Resistor", Case-EIA=0603, Case-Metric=1608, PackageReference=RESC0603(1608)
  R12 R13 R42: Supplier 1=Digi-Key
R16 R47: library part CMP-1591-00001-1, "0603 (1608 Metric) Chip Resistor", Case-EIA=0603, Case-Metric=1608, Supplier Part Number 1=P430BZCT-ND, PackageReference=RESC0603(1608), Supplier 1=Digi-Key
R18 R36 R37 R38 R39 R41 R70 R71: library part CMP-1591-00001-1, "0603 (1608 Metric) Chip Resistor", Case-EIA=0603, Case-Metric=1608, Supplier Part Number 1=311-10KGRCT-ND, PackageReference=RESC0603(1608), Supplier 1=Digi-Key
R43 R44 R45 R50: "RES SMD 10K OHM 5% 1/4W 0603", Manufacturer="Rohm Semiconductor", Manufacturer Part Number=ESR03EZPJ103, Operating Temperature="-55°C ~ 155°C", Package / Case="0603 (1608 Metric)", Power (Watts)="0.25W, 1/4W", Resistance (Ohms)=10k, Supplier Device Package=0603, Supplier Part Number 1=RHM10KDCT-ND, Temperature Coefficient=±200ppm/°C, Tolerance=±5%, Category=Resistors, ComponentLink1Description=http://rohmfs.rohm.com/en/products/databook/datasheet/passive/resistor/chip_resistor/esr.pdf, ComponentLink1URL=http://rohmfs.rohm.com/en/products/databook/datasheet/passive/resistor/chip_resistor/esr.pdf, Composition="Thick Film", Failure Rate=-, Features="Automotive AEC-Q200, Pulse Withstanding", Height - Seated (Max)="0.022\" (0.55mm)", LatestRevisionDate=17-Jul-2002, LatestRevisionNote="Re-released for DXP Platform.", PackageDescription="Axial Device, Thru-Hole; 2 Leads; 0.3 in Pin Spacing", PackageReference=AXIAL-0.3, Packaging="Cut Tape (CT)", Part Status=Active, Pricing 1="1=0.15, 10=0.119, 25=0.0824, 50=0.0642, 100=0.0458, 250=0.03568, 500=0.02836, 1000=0.02012 (CAD)", Published=8-Jun-2000, Publisher="Altium Limited", RoHS="RoHS Compliant", Size / Dimension="0.063\" L x 0.031\" W (1.60mm x 0.80mm)", Stock 1=0, Supplier 1=Digi-Key
R46: "RES SMD 100 OHM 5% 1/4W 0603", Manufacturer="Rohm Semiconductor", Manufacturer Part Number=ESR03EZPJ101, Operating Temperature="-55°C ~ 155°C", Package / Case="0603 (1608 Metric)", Power (Watts)="0.25W, 1/4W", Resistance (Ohms)=100, Supplier Device Package=0603, Supplier Part Number 1=RHM100DCT-ND, Temperature Coefficient=±200ppm/°C, Tolerance=±5%, Category=Resistors, ComponentLink1Description=http://rohmfs.rohm.com/en/products/databook/datasheet/passive/resistor/chip_resistor/esr.pdf, ComponentLink1URL=http://rohmfs.rohm.com/en/products/databook/datasheet/passive/resistor/chip_resistor/esr.pdf, Composition="Thick Film", Failure Rate=-, Features="Automotive AEC-Q200, Pulse Withstanding", Height - Seated (Max)="0.022\" (0.55mm)", LatestRevisionDate=17-Jul-2002, LatestRevisionNote="Re-released for DXP Platform.", PackageDescription="Axial Device, Thru-Hole; 2 Leads; 0.3 in Pin Spacing", PackageReference=AXIAL-0.3, Packaging="Cut Tape (CT)", Part Status=Active, Pricing 1="1=0.15, 10=0.119, 25=0.0824, 50=0.0642, 100=0.0458, 250=0.03568, 500=0.02836, 1000=0.02012 (CAD)", Published=8-Jun-2000, Publisher="Altium Limited", RoHS="RoHS Compliant", Size / Dimension="0.063\" L x 0.031\" W (1.60mm x 0.80mm)", Stock 1=57430, Supplier 1=Digi-Key
R49: library part CMP-1591-00001-1, "0603 (1608 Metric) Chip Resistor", Case-EIA=0603, Case-Metric=1608, Supplier Part Number 1=P1.00KHCT-ND, PackageReference=RESC0603(1608), Supplier 1=Digi-Key
R69: library part Res3, "Resistor", Supplier Part Number 1=696-1688-5-ND, LatestRevisionDate=29-May-2009, LatestRevisionNote="IPC-7351 Footprint Added.", PackageDescription="Chip Resistor", PackageReference=J1-0603, Published=8-Jun-2000, Publisher="Altium Limited", Supplier 1=Digi-Key
U1: "Voltage Regulator", Supplier Part Number 1=811-3014-ND, LatestRevisionDate=29-May-2009, LatestRevisionNote="IPC-7351 Footprint Added.", PackageDescription="3-Pin Transistor Outline Package 2.54 mm Pitch, 15.1 mm Lead Span", PackageReference=D2PAK, Published=24-Mar-1999, Publisher="Altium Limited", Supplier 1=Digi-Key, Supplier 2=Digi-Key
U2: library part CMP-0826-00001-1, "Linear Current Sensor IC, 4.5 to 5.5 V Supply Voltage, 10 mA Supply Current, -40 to 85 degC, 8-Pin SOIC (LC), RoHS, Tape and Reel", Manufacturer="Allegro Microsystems", Operating Temperature Range="-40 to 85 degC", PartNumber=ACS712ELCTR-20A-T, Supplier Part Number 1=620-1190-1-ND, CLOAD="10 nF Max.", ComponentLink1Description="Manufacturer URL", ComponentLink1URL=http://www.allegromicro.com/, ComponentLink2Description=Datasheet, ComponentLink2URL=http://www.allegromicro.com/~/media/Files/Datasheets/ACS712-Datasheet.ashx, DatasheetVersion="Rev. 15", F="80 kHz", ICC="10 mA", Mounting Technology="Surface Mount", Optimized Accuracy Range="+/- 20 A", PackageDescription="8-Pin SOIC, Body 4.9 x 3.9 mm, Pitch 1.27 mm", PackageReference=LC-8, Packing="Tape and Reel", RLOAD="4.7 kOhm Min.", RoHS=TRUE, Sensitivity Sens="100 mV/A Typ.", Supplier 1=Digi-Key, TR="3.5 us", VCC="4.5 to 5.5 V"
U4 U8: library part CMP-1685-00007-1, "Precision Timer, 4.5 to 16 V, 0 to 70 degC, 8-Pin SOIC (D8), Green (RoHS & no Sb/Br), Tape and Reel", Case\Package=SMA, Forward Current="1 A", Forward Voltage="450 mV", Max Operating Temperature="125 degC", Max Surge Current="30 A", Min Operating Temperature="-55 degC", Package Quantity=1, Peak Reverse Current="500 uA", Supplier Part Number 1=296-6501-1-ND, Code_JEDEC=MS-012, ComponentLink1Description="Manufacturer URL", ComponentLink1URL=http://www.ti.com/, ComponentLink2Description=Datasheet, ComponentLink2URL=http://www.ti.com/general/docs/lit/getliterature.tsp?genericPartNumber=NE555&fileType=pdf, ComponentLink3Description="Package Specification", ComponentLink3URL=http://www.ti.com/lit/ml/msoi002j/msoi002j.pdf, DatasheetVersion="SLFS022I, 09/2014", Height="2.44 mm", Length="4.57 mm", Mount="Surface Mount", PackageDescription="8-Pin Small Outline Integrated Circuit, Body 4.9 x 3.9 mm, Pitch 1.27 mm", PackageReference=D0008A, PackageVersion="4040047-3/M, 06/2011", Packaging="Cut Tape", Pins=2, Radiation Hardening=No, REACH SVHC=Unknown, RoHSCompliant=true, Supplier 1=Digi-Key, Width="2.84 mm"
U6: "Voltage Regulator", Supplier Part Number 1=811-2692-ND, LatestRevisionDate=29-May-2009, LatestRevisionNote="IPC-7351 Footprint Added.", PackageDescription="3-Pin Transistor Outline Package 2.54 mm Pitch, 15.1 mm Lead Span", PackageReference=D2PAK, Published=24-Mar-1999, Publisher="Altium Limited", Supplier 1=Digi-Key, Supplier 2=Digi-Key
U7: library part CMP-0474-00861-1, "UV, OV and Reverse Supply Protection Controller, 2.5 to 34 V Vin, 8-pin SOT23 (TS8-8), -40 to 85 degC, Pb-Free, Mini Tape and Reel", Extended Temp="C, I, H", Manufacturer="Linear Technology", Power Good=no, Supplier Part Number 1=LTC4365ITS8#TRMPBFCT-ND, Active Limiting=no, Circuit Breakers(#)=1, Code_JEDEC=MO-193, ComponentLink1Description="Manufacturer URL", ComponentLink1URL=http://www.linear.com/, ComponentLink2Description=Datasheet, ComponentLink2URL=http://cds.linear.com/docs/en/datasheet/4365f.pdf, ComponentLink3Description="Package Specification", ComponentLink3URL=http://cds.linear.com/docs/en/packaging/SOT_8_05-08-1637.pdf, Fast Comparator=no, Fault=yes, Foldback=no, Mounting Technology="Surface Mount", PackageDescription="8-Pin Plastic TSOT-23, Body 2.9 x 1.63 mm, Pitch 0.65 mm", PackageReference=TS8-8, PackageVersion="Rev. A, 08/2010", Packing="Mini Tape and Reel", PartNumber=LTC4365ITS8#TRMPBF, Reset=no, RoHS=TRUE, Supplier 1=Digi-Key, Vin Range="2.5 to 34 V"
WM1 WM9796-ND: library part "Header 2", "Header, 2-Pin", Supplier Part Number 1=WM11908-ND, LatestRevisionDate=17-Jul-2002, LatestRevisionNote="Re-released for DXP Platform.", Publisher="Altium Limited", Supplier 1=Digi-Key

## Via types
v1: diameter 31, hole 17, Top Layer to Bottom Layer, 2028 vias
v2: diameter 50, hole 28, Top Layer to Bottom Layer, 12 vias
v3: diameter 250, hole 137, Top Layer to Bottom Layer, 11 vias
v4: diameter 170, hole 128, Top Layer to Bottom Layer, 4 vias

## Nets (pads, with @x,y where several pads share a name; then routed paths per layer and width w, separated by ;. In a path a pad name is that pad's centre, name@x,y a point inside that pad or via, vN(x,y) a via of type N, cw(c..) or ccw(c..) an arc to the next point about the centre after c; other vN are vias at no path point)
3V3: 3V3.1 C2.2 CN1.35 CON1.A11 CON1.B1 CON2.A4 CON2.B10 R1.2 R2.1 U1.3 | length 9144.1
  Top Layer w10: U1.3@1931,2211 2002,2140 2002,2064.46 2046.78,2019.69 2296.23,2019.69 CN1.35@2351.54,1964.38
  Top Layer w20: CON2.A4@889,3390 837,3338 837,3035.72 848.72,3024 1048,3024 3V3.1@1240,2832 C2.2@1240,2680.06 1295.12,2624.94 R1.2@1315,2624.94 1315.06,2625 1389.94,2625 R2.1@1390,2624.94 1430.98,2583.96 1488.04,2583.96 1548.31,2644.24 1548.31,2726.5 v1(1596.5,2774.69) ; CON2.B10@989,3990 941.88,4037.12 875.25,4037.12 841.88,4070.48 841.88,4527.51 872.37,4558 916,4558 993,4635 1365,4635 1525,4795 2385,4795 v1(2505,4675) ; v1(3462.4,3435) v1(3462.4,3615) ; v1(3526,4614) 3526,4162.1 3598.1,4090 CON1.A11@3604.56,4090 ; v1(3535,3765) 3526,3774 3526,4011.44 CON1.A11@3604.56,4090 ; CON1.A11@3618.02,4090 CON1.A11@3604.56,4090 ; v1(3635,3032) 3637.1,3034.1 3662.12,3034.1 CON1.B1@3718.02,3090
  Bottom Layer w20: CON2.A4@889,3390 841.88,3437.12 841.88,4009.52 869.48,4037.12 941.88,4037.12 CON2.B10@989,3990 ; v1(1596.5,2774.69) 1596.5,2651.39 1629,2618.89 1629,2417.32 1753.79,2292.53 1849.47,2292.53 U1.3@1931,2211 ; v1(2505,4675) 2505,4677.98 2517.5,4690.48 2517.5,4693.46 2539.04,4715 3310,4715 3332.5,4692.5 3332.5,4692 3352.5,4672 3468,4672 v1(3526,4614) ; v1(3462.4,3435) 3462.4,3137.6 3568,3032 v1(3635,3032) ; v1(3462.4,3615) 3462.4,3697.29 3530.11,3765 v1(3535,3765)
3V3_ON: D1.1 R2.2 | length 79.6
  Top Layer w20: R2.2@1390,2680.06 1453.79,2680.06 D1.1@1465,2691.27
5V: 5V.1 C4.2 C13.2 CON2.B4 CON2.B7 F1.1 F8.1 F8.2 L4.2 R10.1 R15.2 U2.8 U6.3 | length 13887.8
  Top Layer w10: v1(1517,2067) 1517,1558.59 1537.28,1538.31 1537.28,1536.34 1548.03,1525.59 C4.2@1550,1525.59 1550.35,1525.24 U2.8@1630,1525.24